# Altium PCB Quickswitch_BRD.PcbDoc (part 1 of 2)
Units mm, origin at the board's own origin, x right, y up, seen from the top; angles counter-clockwise.
Board outline 35 x 35 mm, 2 copper layers (Top Layer, Bottom Layer), stack 1.57 mm thick; 44 components, 30 nets, 158 pads, 68 vias.
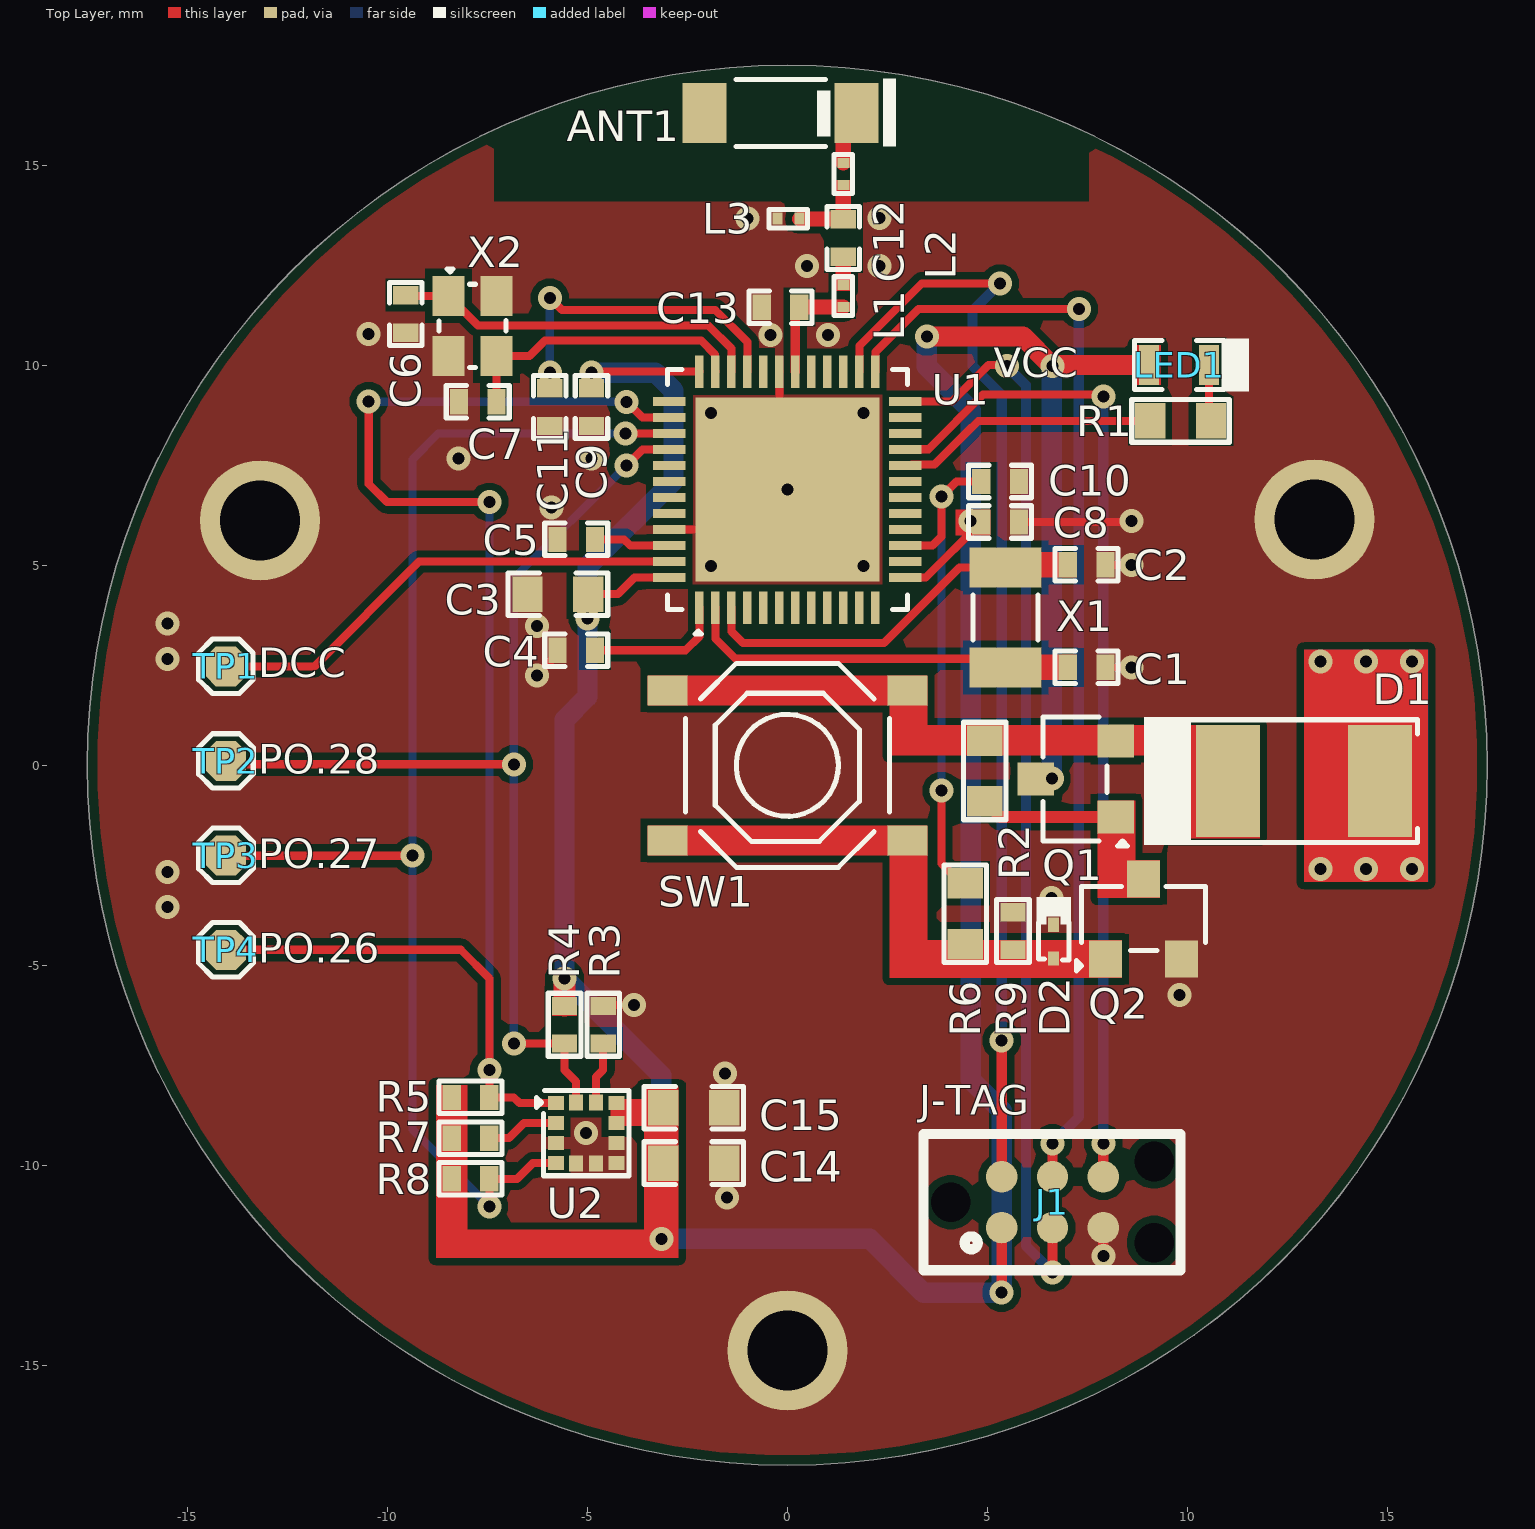
[diagram p0: Top Layer view]
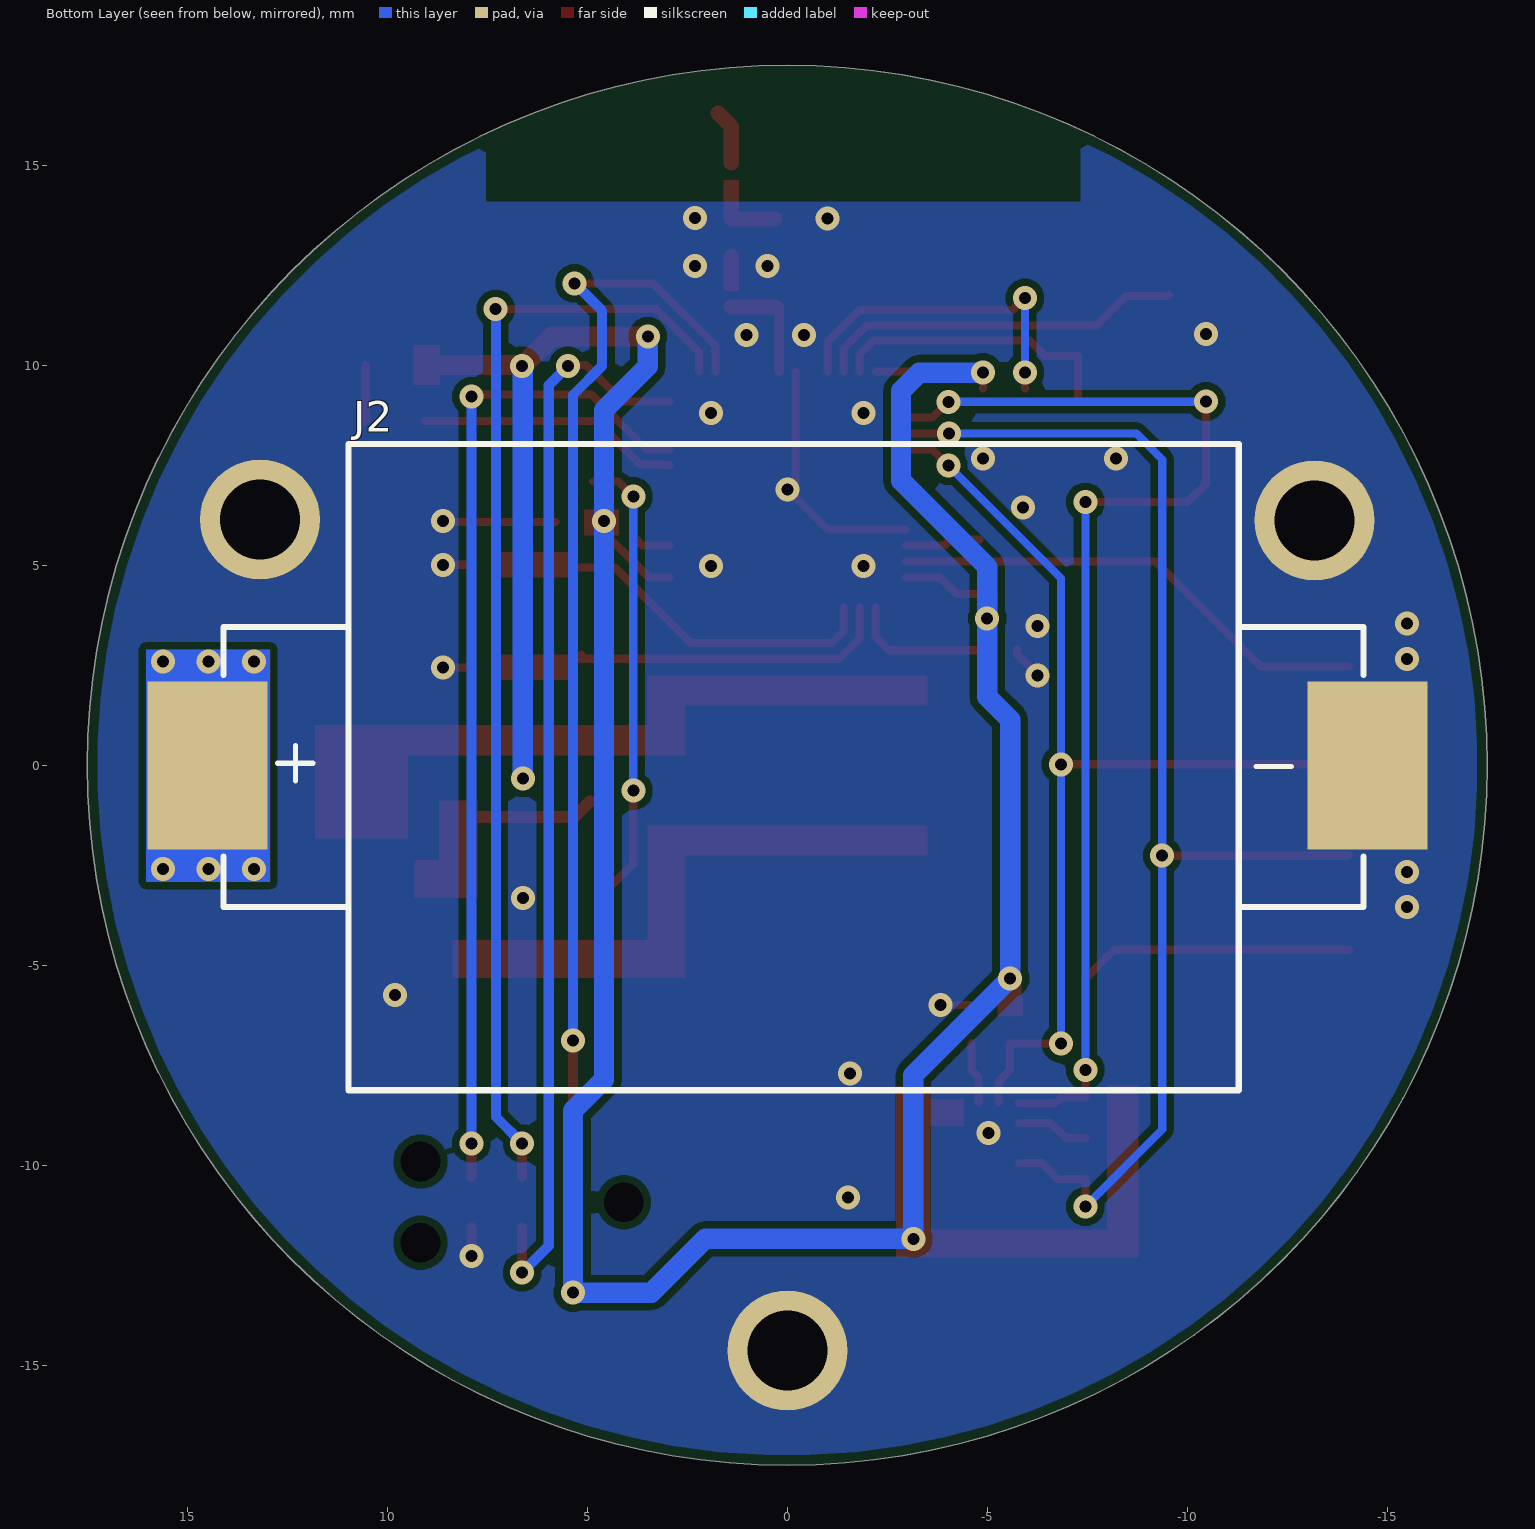
[diagram p1: Bottom Layer view, seen from below]
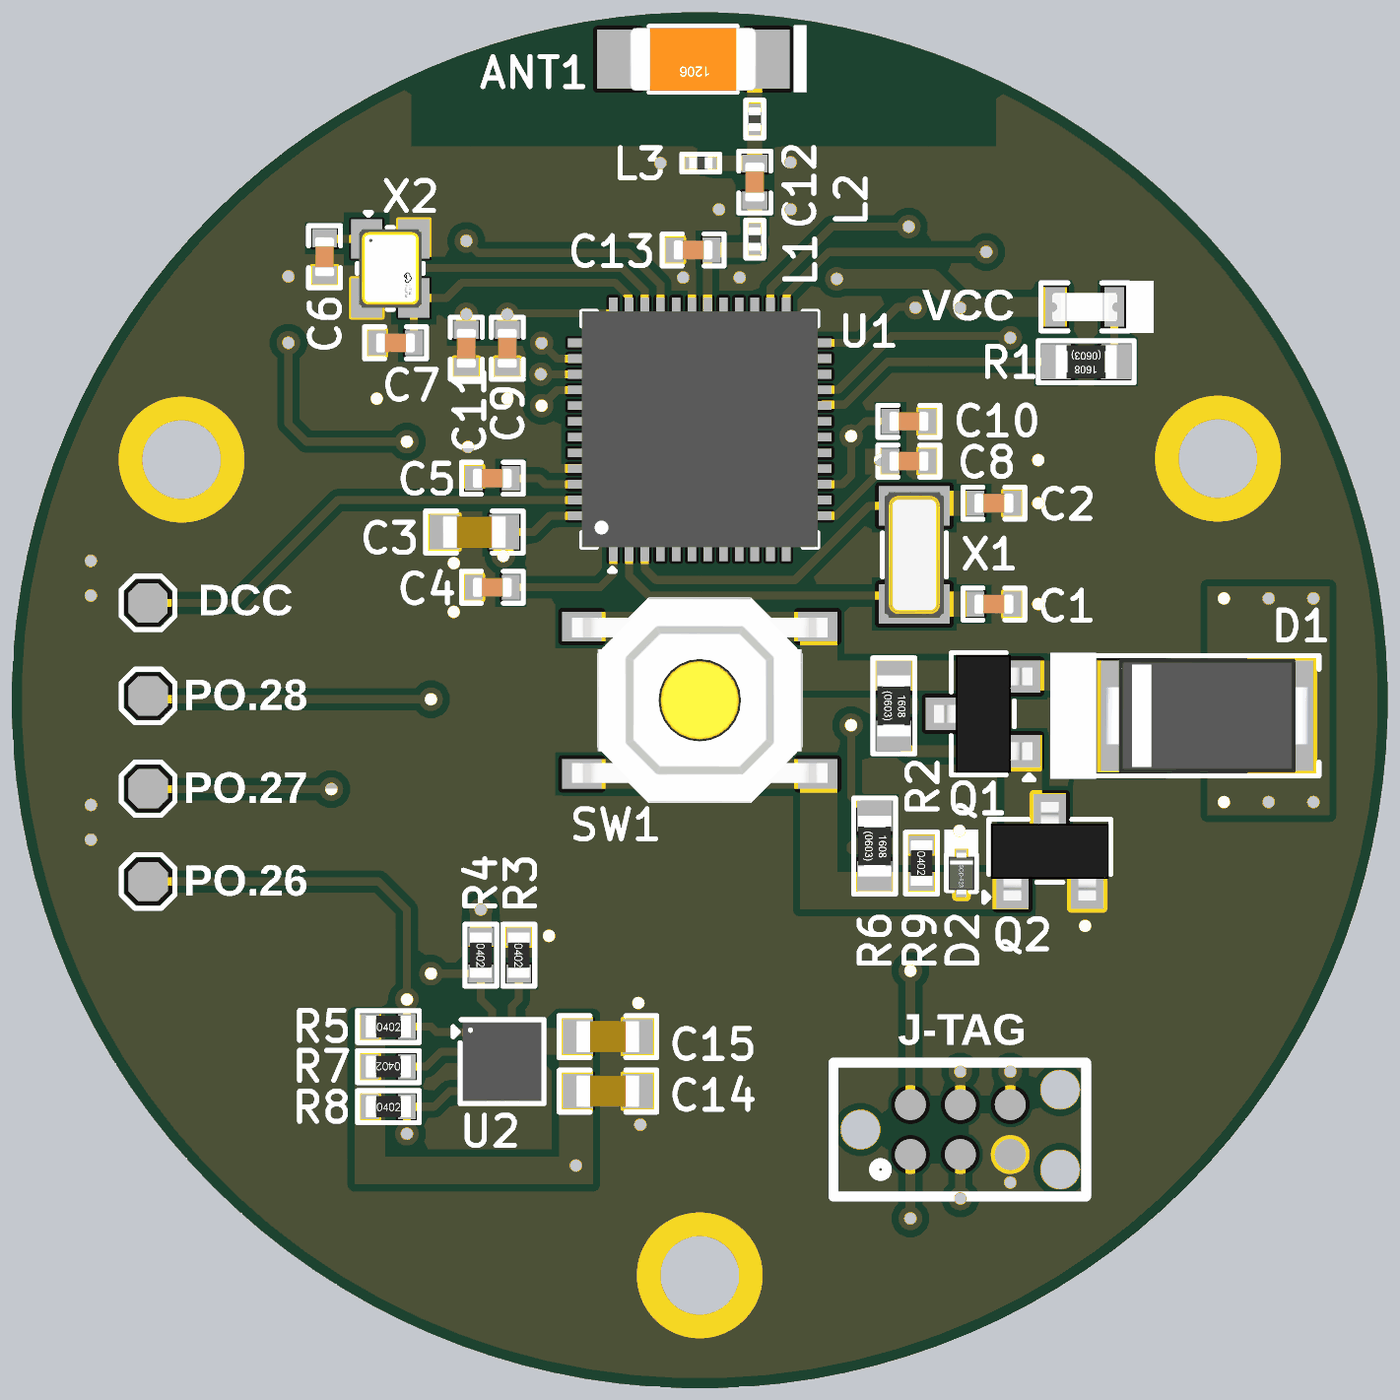
[diagram p2: 3D render of the assembled board from above, using the file's embedded part models]

## Layer stack, top to bottom
Top Solder: solder mask 0.01, Solder Resist, Dk 3.5
Top Layer: signal copper 0.035
Dielectric 1: dielectric 1.5, FR-4, Dk 4.8
Bottom Layer: signal copper 0.035
Bottom Solder: solder mask 0.01, Solder Resist, Dk 3.5

## Board outline
0,-17.5 cw(c0,0) -17.5,0 cw(c0,0) 0,17.5 cw(c0,0) 17.5,0 cw(c0,0)

## Design rules (kind name [scope] priority, off if disabled: settings)
BoardOutlineClearance [All] p1: gap=0 ignorepadtopadclearanceinfootprint=FALSE except(0.254: Poly-OutlineEdge)
Clearance [All] p1: gap=0.178 ignorepadtopadclearanceinfootprint=TRUE except(0.102: Arc-SMDPad Track-SMDPad SMDPad-SMDPad)
HoleSize [All] p1: absolutevalues=TRUE maxlimit=25.4 minlimit=0.025 maxpercent=80.000 minpercent=20.000
MinimumSolderMaskSliver [All] p1: minsoldermaskwidth=0
PolygonConnect [All] p1: connectstyle=Direct reliefconductorwidth=0.254 reliefentries=4 polygonreliefangle="90 Angle" airgapwidth=0.254
RoutingVias [All] p1: holewidth=0.3 width=0.6 viastyle="Through Hole" minholewidth=0.3 minwidth=0.6 maxholewidth=0.3 maxwidth=0.6
SilkToSilkClearance [All] p1: silktosilkclearance=0
SilkToSolderMaskClearance [IsPad] p1: minsilkscreentomaskgap=0 clearancetoexposedcopper=TRUE
SolderMaskExpansion [All] p1: expansion=0.102 istentingtop=FALSE
SupplyNets "Schematic Supply Nets_2" [InNet('VCC')] p1: voltage=0.000
SupplyNets "Schematic Supply Nets_1" [InNet('GND')] p2: voltage=0.000
SupplyNets "Schematic Supply Nets" [InNet('BATT+')] p3: voltage=0.000
UnRoutedNet [All] p1: checkbadconnections=TRUE
Width [All] p1: maxlimit=2.54 minlimit=0.203 preferedwidth=0.559
Width "50 OHM" [InNet('ANT') or InNet('NetC12_2') or InNet('NetC12_1') or InNet('NetANT1_1')] p2: maxlimit=2.636 minlimit=2.636 preferedwidth=2.636 impedanceprofiledriven=TRUE impedanceprofileid={4EB23DA4-F6F3-46A0-BA5C-135B676AABAB} impedanceprofilevalue=50.000000 minimp=50.000000 maximp=50.000000 favimp=50.000000
25 further rules are at their usual default settings.

## Components (designator, comment, footprint, x,y, rotation, side; value= is the part's Value field where it differs from the comment)
ANT1 "2450AT18B100E" ANT-1206 -0.167,16.307 r180 top
C1 "DNP" Cap-0402 7.484,2.448 r180 top locked
C2 "DNP" Cap-0402 7.484,5.013 r180 top locked
C3 "4.7uF" Cap-0603 -5.734,4.28 r0 top locked
C4 "100nF" cap-0402 -5.277,2.875 r0 top locked
C5 "1uF" Cap-0402 -5.276,5.647 r180 top
C6 "10pF" Cap-0402 -9.544,11.283 r90 top
C7 "10pF" Cap-0402 -7.739,9.093 r0 top
C8 "100nF" cap-0402 5.321,6.083 r180 top locked
C9 "100nF" cap-0402 -4.895,8.954 r90 top
C10 "100nF" cap-0402 5.321,7.096 r0 top locked
C11 "100pF" Cap-0402 -5.939,8.954 r270 top
C12 "2.2pF" Cap-0402 1.4,13.183 r90 top
C13 "0.8pF" Cap-0402 -0.168,11.456 r0 top
C14 "0.1uF" Cap-0603 -2.337,-8.559 r180 top locked
C15 "10uF" Cap-0603 -2.337,-9.944 r0 top locked
D1 "SS14" SMA(DO-214AC) 12.911,-0.394 r0 top locked
D2 "ESD9B3.3ST5G-ES" SOD-923. 6.657,-4.409 r270 top locked
J1 "TC2030-IDC-NL" TC2030-IDC-NL_ 6.629,-10.922 r0 top locked
J2 "CR2032-BS-6-1" CR2032-BS-6-1 0,0 r0 bottom locked
L1 "3.9nH" IND-0201 1.4,11.731 r90 top
L2 "3.9nH" IND-0201 1.4,14.783 r90 top
L3 "DNP" IND-0201 0.027,13.665 r0 top
LED1 "XL-1608UBC-04" LED-0603 9.795,10.008 r0 top locked
Q1 "AO3401" SOT-23 7.209,-0.345 r90 top
Q2 "BSS138LT1G" SOT-23 8.906,-3.843 r0 top locked
R1 "330R" Res-0603 9.83,8.611 r0 top locked
R2 "1M" Res-0603 4.938,-0.142 r90 top
R3 "10K" Res-0402 -4.604,-6.485 r270 top locked value=10kR
R4 "10K" Res-0402 -5.569,-6.485 r270 top locked value=10kR
R5 "4.7K" Res-0402 -7.92,-8.303 r0 top locked
R6 "470R" Res-0603 4.449,-3.71 r90 top locked
R7 "10K" Res-0402 -7.92,-9.321 r180 top locked value=10kR
R8 "4.7K" Res-0402 -7.92,-10.339 r0 top locked
R9 "10K" Res-0402 5.641,-4.142 r270 top locked value=10kR
SW1 "TS-1187A-B-A-B" TS-1187A-B-A-B 0,0 r0 top locked
TP1 "TEST POINT 0.5mm Dia" "Test-point - 0.5mm" -14.037,2.475 r90 top locked
TP2 "TEST POINT 0.5mm Dia" "Test-point - 0.5mm" -14.034,0.111 r0 top locked
TP3 "TEST POINT 0.5mm Dia" "Test-point - 0.5mm" -14.034,-2.251 r0 top locked
TP4 "TEST POINT 0.5mm Dia" "Test-point - 0.5mm" -14.034,-4.612 r0 top locked
U1 "NRF52832-QFAA-R" QFN-48-EP(6x6) 0,6.893 r90 top
U2 "LIS2DW12TR" "12-LGA (2x2)" -5.029,-9.194 r0 top locked
X1 "DNP" SMD3215-2P 5.459,3.698 r90 top locked
X2 "32MHz" SMD2016-4P -7.871,10.986 r270 top

## Footprints (in the part's own frame and the unit in brackets; to place one, negate y for a bottom-side part, rotate by r counter-clockwise, add the part's x,y. Pads: shape width x height; smd on the part's side, far side on the other; paste and mask are expansions set on the pad)
"12-LGA (2x2)" [mm]
  rect 0.4x0.35 smd mask+0.05: 1(-0.76,0.75) 2(-0.76,0.25) 3(-0.76,-0.25) 4(-0.76,-0.75) 7(0.76,-0.75) 8(0.76,-0.25) 9(0.76,0.25) 10(0.76,0.75)
  rect 0.35x0.4 smd mask+0.05: 5(-0.25,-0.76) 6(0.25,-0.76) 11(0.25,0.76) 12(-0.25,0.76)
  silkscreen extent -1.24,-1.07 1.07,1.07, body extent -1,-1 1,1, height 0.7
ANT-1206 [mm]
  rect 1.1x1.5 smd: 1(-1.9,0) 2(1.9,0)
  silkscreen extent -2.89,-0.86 1.12,0.84, body extent -1.6,-0.8 1.6,0.8, height 1
Cap-0402 [mil]
  rect 18x25 smd mask+2.36: 1(-18.5,0) 2(18.5,0)
  silkscreen extent -31,-16 31,16, body extent -20,-10 20,10, height 19
cap-0402 [mil]
  rect 18x25 smd mask+2.36: 1(-18.5,0) 2(18.5,0)
  silkscreen extent -31,-16 31,16, body extent -20,-10 20,10, height 19
Cap-0603 [mil]
  rect 30x35 smd mask+2.36: 1(-30,0) 2(30,0)
  silkscreen extent -49,-21 49,21, body extent -32,-16 31,16, height 34
CR2032-BS-6-1 [mm]
  rect 3x4.2 smd: 1(14.5,0) 2(-14.5,0)
  silkscreen extent -14.41,-8.03 14.09,8.12, body extent -15.65,-8 15.65,8, height 5.6
IND-0201 [mm]
  rect 0.25x0.3 smd mask+0.055: 1(-0.275,0) 2(0.275,0)
  silkscreen extent -0.48,-0.23 0.48,0.23, body extent -0.3,-0.15 0.3,0.15, height 0.15
LED-0603 [mm]
  rect 0.5x1 smd: 1(-0.75,0) 2(0.75,0)
  silkscreen extent -1.12,-0.66 1.75,0.66, body extent -0.82,-0.37 0.82,0.36, height 0.68
QFN-48-EP(6x6) [mm]
  rect 0.81x0.22 smd mask+0.07: 1(-2.95,2.2) 2(-2.95,1.8) 3(-2.95,1.4) 4(-2.95,1) 5(-2.95,0.6) 6(-2.95,0.2) 7(-2.95,-0.2) 8(-2.95,-0.6) 9(-2.95,-1) 10(-2.95,-1.4) 11(-2.95,-1.8) 12(-2.95,-2.2) 25(2.95,-2.2) 26(2.95,-1.8) 27(2.95,-1.4) 28(2.95,-1) 29(2.95,-0.6) 30(2.95,-0.2) 31(2.95,0.2) 32(2.95,0.6) 33(2.95,1) 34(2.95,1.4) 35(2.95,1.8) 36(2.95,2.2)
  rect 0.22x0.81 smd mask+0.07: 13(-2.2,-2.95) 14(-1.8,-2.95) 15(-1.4,-2.95) 16(-1,-2.95) 17(-0.6,-2.95) 18(-0.2,-2.95) 19(0.2,-2.95) 20(0.6,-2.95) 21(1,-2.95) 22(1.4,-2.95) 23(1.8,-2.95) 24(2.2,-2.95) 37(2.2,2.95) 38(1.8,2.95) 39(1.4,2.95) 40(1,2.95) 41(0.6,2.95) 42(0.2,2.95) 43(-0.2,2.95) 44(-0.6,2.95) 45(-1,2.95) 46(-1.4,2.95) 47(-1.8,2.95) 48(-2.2,2.95)
  rect 4.6x4.6 smd paste-3: 49(0,0)
  silkscreen extent -3.61,-3 3,3, body extent -3,-3 3,3, height 0.9
Res-0402 [mil]
  rect 18x25 smd mask+2.17: 1(-18.5,0) 2(18.5,0)
  silkscreen extent -32,-17 32,16, body extent -23,-11 23,11, height 16
Res-0603 [mil]
  rect 30x35 smd: 1(-30,0) 2(30,0)
  silkscreen extent -48,-21 48,21, body extent -31,-17 31,17, height 18
SMA(DO-214AC) [mm]
  rect 1.6x2.8 smd: 1(-1.9,0) 2(1.9,0)
  silkscreen extent -3.99,-1.6 2.84,1.6, body extent -2.6,-1.45 2.6,1.45, height 2.3
SMD2016-4P [mm]
  rect 1x0.8 smd paste+0 mask+0.051: 1(-0.75,-0.6) 2(0.75,-0.6) 3(0.75,0.6) 4(-0.75,0.6)
  silkscreen extent -1.42,-0.84 1.04,0.84, body extent -1,-0.8 1,0.8, height 0.47
SMD3215-2P [mm]
  rect 1x1.8 smd: 1(-1.25,0) 2(1.25,0)
  silkscreen extent -0.56,-0.81 0.56,0.81, body extent -1.6,-0.75 1.6,0.75, height 0.8
SOD-923. [mm]
  rect 0.36x0.27 smd: 1(-0.42,0) 2(0.42,0)
  silkscreen extent -1.12,-0.43 0.46,0.43, body extent -0.52,-0.32 0.53,0.33, height 0.43
SOT-23 [mm] "TRANS NPN 40V 0.6A SOT23"
  rect 0.82x0.92 smd: 1(-0.95,-1) 2(0.95,-1) 3(0,1)
  silkscreen extent -1.68,-1.3 1.55,0.81, body extent -1.5,-1.25 1.5,1.25, height 1.05
TC2030-IDC-NL_ [mil]
  round 30.98 smd: 1(-50,-25) 1(-50,-25) 2(-50,25) 3(0,-25) 4(0,25) 5(50,-25) 6(50,25)
  round 0 hole 39.02: MP1(-100,0) MP2(100,40) MP3(100,-40)
  silkscreen extent -127,-67 126,67
"Test-point - 0.5mm" [mm]
  oct 1x1 smd: 1(0,0)
  silkscreen extent -0.68,-0.68 0.68,0.68
TS-1187A-B-A-B [mm]
  rect 1x0.75 smd: 1(-3,1.875) 2(3,1.875) 3(-3,-1.875) 4(3,-1.875)
  silkscreen extent -2.55,-2.55 2.55,2.55, body extent -3.25,-2.6 3.25,2.6, height 1.55

## Part data
ANT1: "RF ANT 2.4GHZ CHIP SOLDER SMD", Manufacturer=Johanson, Category="RF Antennas", ComponentLink1Description=https://datasheet.ciiva.com/24025/antenna-2450at18b100-242422-24025839.pdf?src-supplier=Mouser, ComponentLink1URL=https://datasheet.ciiva.com/24025/antenna-2450at18b100-242422-24025839.pdf?src-supplier=Mouser, ComponentLink2Description=https://datasheet.ciiva.com/1124/1318299-1124918.pdf?src-supplier=Element14, ComponentLink2URL=https://datasheet.ciiva.com/1124/1318299-1124918.pdf?src-supplier=Element14, Manufacturer Part Number=2450AT18B100E, Pricing="3000=0.3724, 6000=0.3688, 9000=0.3651, 12000=0.3615, 15000=0.3579, 30000=0.3542 (USD)", RoHS=Yes, Stock=792000, Supplier="Arrow Electronics", Supplier Part Number=2450AT18B100E
C1 C2: library part CC0402FRNPO9BN130, "CAP CER 13PF 50V C0G/NP0 0402", LCSC Part Number=C541433, Manufacturer=Yageo, Item Type=Capacitors, Manufacturer Part Number=CC0402FRNPO9BN130, Pricing="10000=0.00937 (USD)", RoHS=No, Supplier=Digikey
C3: library part GRM188R61E475KE11D, "CAP CER 4.7UF 25V X5R 0603", Case Code (Imperial)=0603, Case Code (Metric)=1608, Dielectric=X5R, LCSC Part Number=C90057, Manufacturer=Murata, Max Operating Temperature=85°C, Min Operating Temperature=-55°C, Package Quantity=4000, Supplier Part Number 1=490-7203-1-ND, Tolerance=10%, Voltage=25V, Capacitance=4.7uF, Case/Package=0603, ComponentLink1Description=http://www.farnell.com/datasheets/2048165.pdf?src-supplier=Element14, ComponentLink1URL=http://www.farnell.com/datasheets/2048165.pdf?src-supplier=Element14, ComponentLink2Description=https://www.murata.com/~/media/webrenewal/support/library/catalog/products/capacitor/mlcc/c02e.ashx?la=en-us&src-supplier=Digi-Key, ComponentLink2URL=https://www.murata.com/~/media/webrenewal/support/library/catalog/products/capacitor/mlcc/c02e.ashx?la=en-us&src-supplier=Digi-Key, Depth=0.8mm, Height=0.8mm, Lead Free="Lead Free", Length=1.6mm, Manufacturer Part Number=GRM188R61E475KE11D, Material=Ceramic, Mount="Surface Mount", Packaging="Cut Tape", Pricing 1="1=0.37, 10=0.258, 100=0.1549, 500=0.1162, 1000=0.09812 (USD)", REACH SVHC="No SVHC", Stock 1=71618, Supplier 1=Digi-Key, Thickness=0.031inch, Voltage Rating=25V, Voltage Rating (DC)=25V, Width=0.031inch
C4 C8 C9 C10: library part C1005X7R1H104KT000F, "CAP CER 0.1UF 50V X7R 0402", Dielectric=X7R, LCSC Part Number=C361198, Manufacturer=TDK, Tolerance=10%, Voltage=25V, Category="Ceramic Capacitors", ComponentLink1Description=LCSC, ComponentLink1URL=https://www.lcsc.com/product-detail/Multilayer-Ceramic-Capacitors-MLCC-SMD-SMT_TDK-C1005X7R1H104KT000F_C361198.html, Item Type=Capacitor, Manufacturer Part Number=C1005X7R1H104KT000F, RoHS=No, Supplier 1=Avnet, Supplier Part Number 1=C1005X7R1H104KT000F
C5: library part CC0402KRX5R7BB105, "CAP CER 1UF 16V X5R 0402", Case Code (Imperial)=0402, Case Code (Metric)=1005, Dielectric=X5R, LCSC Part Number=C325464, Manufacturer=Yageo, Max Operating Temperature=85°C, Min Operating Temperature=-55°C, Supplier Part Number 1=311-1691-6-ND, Tolerance=10%, Voltage Rating=16V, Capacitance=1uF, Case/Package=0402, ComponentLink1Description=http://www.yageo.com/documents/recent/UPY-GPHC_X5R_4V-to-50V_12.pdf?src-supplier=Avnet+Europe, ComponentLink1URL=http://www.yageo.com/documents/recent/UPY-GPHC_X5R_4V-to-50V_12.pdf?src-supplier=Avnet+Europe, Composition=Ceramic, Depth=0.5mm, Halogen Free="Halogen Free", Height=0.5mm, Item Type=Capacitor, Lead Free="Lead Free", Length=1mm, Manufacturer Part Number=CC0402KRX5R7BB105, Mount="Surface Mount", Packaging="Tape and Reel", Pricing 1="1=0.36, 10=0.252, 100=0.1512, 500=0.1134, 1000=0.09576, 2500=0.09072, 5000=0.08568 (USD)", Radiation Hardening=No, Stock 1=1405667, Supplier 1=Digi-Key, Termination=SMD/SMT, Thickness=0.022inch, Voltage Rating (DC)=16V, Weight=2.3E-05oz, Width=0.02inch
C6 C7: library part GRM1555C1H100JA01D, "CAP CER 10PF 50V C0G/NP0 0402", Case Code (Imperial)=0402, Case Code (Metric)=1005, Dielectric=C0G, LCSC Part Number=C76946, Manufacturer=Murata, Max Operating Temperature=125°C, Min Operating Temperature=-55°C, Package Quantity=1, Tolerance=5%, Voltage=50V, Case/Package=0402, Category="Ceramic Capacitors", ComponentLink1Description=https://datasheet.ciiva.com/2989/product-2989280.pdf?src-supplier=Avnet, ComponentLink1URL=https://datasheet.ciiva.com/2989/product-2989280.pdf?src-supplier=Avnet, ComponentLink2Description=https://datasheet.ciiva.com/18184/getdatasheetpartid-307234-18184164.pdf?src-supplier=Verical, ComponentLink2URL=https://datasheet.ciiva.com/18184/getdatasheetpartid-307234-18184164.pdf?src-supplier=Verical, ComponentLink3Description=https://datasheet.ciiva.com/29200/453545-da-01-en-vs-kondensator-0402-29200107.pdf?src-supplier=Conrad, ComponentLink3URL=https://datasheet.ciiva.com/29200/453545-da-01-en-vs-kondensator-0402-29200107.pdf?src-supplier=Conrad, ComponentLink4Description=https://datasheet.ciiva.com/7828/1666664-7828812.pdf?src-supplier=Element14, ComponentLink4URL=https://datasheet.ciiva.com/7828/1666664-7828812.pdf?src-supplier=Element14, ComponentLink5Description=https://datasheet.ciiva.com/6271/partnumbering-e-01-6271159.pdf?src-supplier=Digi-Key, ComponentLink5URL=https://datasheet.ciiva.com/6271/partnumbering-e-01-6271159.pdf?src-supplier=Digi-Key, ComponentLink6Description=https://datasheet.ciiva.com/6271/partnumbering-e-01-6271158.pdf?src-supplier=Digi-Key, ComponentLink6URL=https://datasheet.ciiva.com/6271/partnumbering-e-01-6271158.pdf?src-supplier=Digi-Key, ComponentLink7Description=https://datasheet.ciiva.com/6271/partnumbering-e-01-6271068.pdf?src-supplier=Digi-Key, ComponentLink7URL=https://datasheet.ciiva.com/6271/partnumbering-e-01-6271068.pdf?src-supplier=Digi-Key, Construction=Flat, Depth=0.5mm, Height=0.5mm, Item Type=Capacitor, Lead Free="Lead Free", Length=1mm, Manufacturer Part Number=GRM1555C1H100JA01D, Material=Ceramic, Mounting Technology="Surface Mount", Packaging="Tape and Reel", Pricing="10000=0.0034, 50000=0.0027, 100000=0.0023, 250000=0.0021 (USD)", Radiation Hardening=No, Reach SVHC Compliant=No, RoHS=Yes, RoHS Compliant=Yes, Series=GRM, Stock=3860000, Supplier="Arrow Electronics", Supplier Part Number=GRM1555C1H100JA01D, Termination=SMD/SMT, Thickness=0.022inch, Voltage Rating=50V, Voltage Rating (DC)=50V, Width=0.02inch
C11: library part 04025A101JAT2A, "CAP CER 100PF 50V C0G/NP0 0402", Case Code (Imperial)=0402, Case Code (Metric)=1005, Dielectric=C0G, Insulation Resistance=1GR, LCSC Part Number=C597014, Manufacturer="Kyocera AVX", Max Operating Temperature=125°C, Min Operating Temperature=-55°C, Package Quantity=10000, Temperature Coefficient=30ppm/°C, Tolerance=5%, Voltage=50V, Capacitance=100pF, Case/Package=0402, Category="Ceramic Capacitors", ComponentLink1Description=https://datasheet.ciiva.com/11786/0900766b80def0e2-11786618.pdf?src-supplier=RSComponents, ComponentLink1URL=https://datasheet.ciiva.com/11786/0900766b80def0e2-11786618.pdf?src-supplier=RSComponents, ComponentLink2Description=https://datasheet.ciiva.com/1123/493359-1123473.pdf?src-supplier=Element14, ComponentLink2URL=https://datasheet.ciiva.com/1123/493359-1123473.pdf?src-supplier=Element14, ComponentLink3Description=https://datasheet.ciiva.com/1123/493359-1123474.pdf?src-supplier=Element14, ComponentLink3URL=https://datasheet.ciiva.com/1123/493359-1123474.pdf?src-supplier=Element14, ComponentLink4Description=https://datasheet.ciiva.com/16332/ccog-16332501.pdf?src-supplier=Future+Electronics, ComponentLink4URL=https://datasheet.ciiva.com/16332/ccog-16332501.pdf?src-supplier=Future+Electronics, ComponentLink5Description=https://datasheet.ciiva.com/46392/759117-46392007.pdf?src-supplier=Element14, ComponentLink5URL=https://datasheet.ciiva.com/46392/759117-46392007.pdf?src-supplier=Element14, ComponentLink6Description=https://datasheet.ciiva.com/150/ccog-150473.pdf?src-supplier=Digi-Key, ComponentLink6URL=https://datasheet.ciiva.com/150/ccog-150473.pdf?src-supplier=Digi-Key, ComponentLink7Description=https://datasheet.ciiva.com/150/ccog-150474.pdf?src-supplier=Digi-Key, ComponentLink7URL=https://datasheet.ciiva.com/150/ccog-150474.pdf?src-supplier=Digi-Key, ComponentLink8Description=https://datasheet.ciiva.com/2987/ccog-2987642.pdf?src-supplier=Avnet, ComponentLink8URL=https://datasheet.ciiva.com/2987/ccog-2987642.pdf?src-supplier=Avnet, ComponentLink9Description=https://datasheet.ciiva.com/150/ccog-150475.pdf?src-supplier=Digi-Key, ComponentLink9URL=https://datasheet.ciiva.com/150/ccog-150475.pdf?src-supplier=Digi-Key, ComponentLink10Description=https://datasheet.ciiva.com/8083/ccog-8083054.pdf?src-supplier=Avnet, ComponentLink10URL=https://datasheet.ciiva.com/8083/ccog-8083054.pdf?src-supplier=Avnet, ComponentLink11Description=https://datasheet.ciiva.com/5413/ccog-5413647.pdf?src-supplier=Mouser, ComponentLink11URL=https://datasheet.ciiva.com/5413/ccog-5413647.pdf?src-supplier=Mouser, Construction=Flat, Contact Plating=Tin,Matte, Depth=0.5mm, Dissipation Factor=2.5%, Height=0.56mm, Item Type=Capacitor, Lead Free="Lead Free", Length=1mm, Manufacturer Part Number=04025A101JAT2A, Mount="Surface Mount,PCB", Packaging="Tape and Reel", Pricing 1="10000=0.10788, 20000=0.10540, 40000=0.10292, 60000=0.10044, 80000=0.09796, 100000=0.09548, 1000000=0.09424 (USD)", Radiation Hardening=No, Reach SVHC Compliant=Yes, RoHS=Yes, RoHS Compliant=Yes, Series=-, Stock 1=3437500, Supplier 1=Avnet, Supplier Part Number 1=04025A101JAT2A, Termination=SMD/SMT, Thickness=0.013inch, Voltage Rating=50V, Voltage Rating (DC)=50V, Width=0.004inch
C12: library part GRM1555C1H2R2BA01D, "CAP CER 2.2PF 50V C0G/NP0 0402", Case Code (Imperial)=0402, Case Code (Metric)=1005, Dielectric=C0G, LCSC Part Number=C88927, Manufacturer=Murata, Max Operating Temperature=125°C, Min Operating Temperature=-55°C, Package Quantity=1, Temperature Coefficient=30ppm/°C, Voltage=50V, Case/Package=0402, Category="Ceramic Capacitors", ComponentLink1Description=https://datasheet.ciiva.com/6270/grm1555c1h2r1wa01-01-6270869.pdf?src-supplier=Digi-Key, ComponentLink1URL=https://datasheet.ciiva.com/6270/grm1555c1h2r1wa01-01-6270869.pdf?src-supplier=Digi-Key, ComponentLink2Description=https://datasheet.ciiva.com/18184/getdatasheetpartid-316203-18184296.pdf?src-supplier=Verical, ComponentLink2URL=https://datasheet.ciiva.com/18184/getdatasheetpartid-316203-18184296.pdf?src-supplier=Verical, ComponentLink3Description=https://datasheet.ciiva.com/16440/c02e-16440539.pdf?src-supplier=Future+Electronics, ComponentLink3URL=https://datasheet.ciiva.com/16440/c02e-16440539.pdf?src-supplier=Future+Electronics, ComponentLink4Description=https://datasheet.ciiva.com/6270/partnumbering-e-01-6270873.pdf?src-supplier=Digi-Key, ComponentLink4URL=https://datasheet.ciiva.com/6270/partnumbering-e-01-6270873.pdf?src-supplier=Digi-Key, ComponentLink5Description=https://datasheet.ciiva.com/6270/partnumbering-e-01-6270877.pdf?src-supplier=Digi-Key, ComponentLink5URL=https://datasheet.ciiva.com/6270/partnumbering-e-01-6270877.pdf?src-supplier=Digi-Key, ComponentLink6Description=https://datasheet.ciiva.com/11615/product-11615030.pdf?src-supplier=Avnet, ComponentLink6URL=https://datasheet.ciiva.com/11615/product-11615030.pdf?src-supplier=Avnet, Construction=Flat, Depth=0.5mm, Height=0.5mm, Item Type=Capacitor, Lead Free="Lead Free", Length=1mm, Manufacturer Part Number=GRM1555C1H2R2BA01D, Material=Ceramic, Mounting Technology="Surface Mount", Packaging="Tape and Reel", Pricing="10000=0.00887, 20000=0.00867, 40000=0.00847 (USD)", Radiation Hardening=No, Reach SVHC Compliant=No, RoHS=Yes, RoHS Compliant=Yes, Series=GRM, Stock=110000, Supplier=Avnet, Supplier Part Number=GRM1555C1H2R2BA01D, Termination=SMD/SMT, Thickness=0.022inch, Voltage Rating=50V, Voltage Rating (DC)=50V, Width=0.5mm
C13: library part CC0402BRNPO9BNR80, "CAP CER 0.8PF 50V C0G/NPO 0402", Case Code (Imperial)=0402, Case Code (Metric)=1005, Dielectric=C0G, LCSC Part Number=C327032, Manufacturer=Yageo, Max Operating Temperature=125°C, Min Operating Temperature=-55°C, Supplier Part Number=4783825, Voltage Rating=50V, Case/Package=0402, Category="Ceramic Capacitors", ComponentLink1Description=http://www.mouser.com/ds/2/447/Yageo_UPY-GP_NP0_16V-to-50V_9-358835.pdf?src-supplier=Mouser, ComponentLink1URL=http://www.mouser.com/ds/2/447/Yageo_UPY-GP_NP0_16V-to-50V_9-358835.pdf?src-supplier=Mouser, ComponentLink2Description=https://datasheet.octopart.com/CC0402BRNPO9BNR80-Yageo-datasheet-151948684.pdf?src-supplier=Newark, ComponentLink2URL=https://datasheet.octopart.com/CC0402BRNPO9BNR80-Yageo-datasheet-151948684.pdf?src-supplier=Newark, ComponentLink3Description=http://www.yageo.com/documents/recent/UPY-GP_NP0_16V-to-50V_16.pdf?src-supplier=Digikey, ComponentLink3URL=http://www.yageo.com/documents/recent/UPY-GP_NP0_16V-to-50V_16.pdf?src-supplier=Digikey, ComponentLink4Description=https://www.yageo.com/upload/media/product/productsearch/datasheet/mlcc/UPY-GP_NP0_16V-to-50V_18.pdf?src-supplier=Digikey, ComponentLink4URL=https://www.yageo.com/upload/media/product/productsearch/datasheet/mlcc/UPY-GP_NP0_16V-to-50V_18.pdf?src-supplier=Digikey, ComponentLink5Description=https://datasheet.octopart.com/CC0402BRNPO9BNR80-Yageo-datasheet-151948684.pdf?src-supplier=Farnell, ComponentLink5URL=https://datasheet.octopart.com/CC0402BRNPO9BNR80-Yageo-datasheet-151948684.pdf?src-supplier=Farnell, ComponentLink6Description=https://datasheet.octopart.com/CC0402BRNPO9BNR80-Yageo-datasheet-137875056.pdf?src-supplier=Future+Electronics, ComponentLink6URL=https://datasheet.octopart.com/CC0402BRNPO9BNR80-Yageo-datasheet-137875056.pdf?src-supplier=Future+Electronics, Halogen Free=5694HalogenFree, Item Type=Capacitor, Lead Free=5697LeadFree, Length=0.039inch, Manufacturer Part Number=CC0402BRNPO9BNR80, Mounting Technology="Surface Mount", Packaging="Tape and Reel", Pricing="10000=0.0034, 40000=0.0032, 150000=0.0031, 250000=0.003, 500000=0.0028 (USD)", RoHS=Yes, RoHS Compliant=Yes, Series=CC, Stock=70000, Supplier="Future Electronics", Termination=SMD/SMT, Thickness=0.022inch, Voltage Rating (DC)=50V, Weight=2.3E-05oz, Width=0.02inch
C14: library part CC0603ZRY5V9BB104, "CAP CER 0.1UF 50V Y5V 0603", Capacitance=100nF, Case Code (Imperial)=0603, Case Code (Metric)=1608, Dielectric=Y5V, LCSC Part Number=C106221, Manufacturer=Yageo, Max Operating Temperature=85°C, Min Operating Temperature=-30°C, Package Quantity=1, Supplier Part Number 1=311-1343-1-ND, Tolerance=80%, Voltage=50V, Case/Package=0603, ComponentLink1Description=http://www.yageo.com/documents/recent/UPY-GPHC_Y5V_6.3V-to-50V_8.pdf?src-supplier=Digi-Key, ComponentLink1URL=http://www.yageo.com/documents/recent/UPY-GPHC_Y5V_6.3V-to-50V_8.pdf?src-supplier=Digi-Key, ComponentLink2Description=http://www.yageo.com/documents/recent/UPY-GPHC_Y5V_6.3V-to-50V_5.pdf?src-supplier=Avnet+Europe, ComponentLink2URL=http://www.yageo.com/documents/recent/UPY-GPHC_Y5V_6.3V-to-50V_5.pdf?src-supplier=Avnet+Europe, ComponentLink3Description=https://www.verical.com/server-webapp/html/getDatasheet?partID=403611&src-supplier=Verical, ComponentLink3URL=https://www.verical.com/server-webapp/html/getDatasheet?partID=403611&src-supplier=Verical, ComponentLink4Description=http://www.mouser.com/ds/2/447/Yageo_UPY-GP_NP0_16V-to-50V_9-358835.pdf?src-supplier=Mouser, ComponentLink4URL=http://www.mouser.com/ds/2/447/Yageo_UPY-GP_NP0_16V-to-50V_9-358835.pdf?src-supplier=Mouser, ComponentLink5Description=http://www.farnell.com/datasheets/1132289.pdf?src-supplier=Element14, ComponentLink5URL=http://www.farnell.com/datasheets/1132289.pdf?src-supplier=Element14, Composition=Ceramic, Depth=0.8mm, Halogen Free="Halogen Free", Height=0.8mm, Item Type=Capacitor, Lead Free="Lead Free", Length=1.6mm, Manufacturer Part Number=CC0603ZRY5V9BB104, Mount="Surface Mount", Number of Pins=2, Packaging="Tape and Reel", Pricing 1="1=0.1, 10=0.075, 100=0.0334, 500=0.02386, 1000=0.01874 (USD)", Radiation Hardening=No, REACH SVHC="No SVHC", Stock 1=15000880, Supplier 1=Digi-Key, Termination=SMD/SMT, Thickness=0.035inch, Voltage Rating=50V, Voltage Rating (DC)=50V, Width=0.031inch
C15: library part CGA0603X5R106K100JT, "10V 10uF X5R ±10% 0603 Multilayer Ceramic Capacitors MLCC - SMD/SMT ROHS", LCSC Part Number=C6119842, Manufacturer=HRE, Package=0603, ComponentLink1Description=LCSC, ComponentLink1URL=https://www.lcsc.com/product-detail/Multilayer-Ceramic-Capacitors-MLCC-SMD-SMT_HRE-CGA0603X5R106K100JT_C6119842.html, Item Type=Capacitor, Manufacturer Part Number=CGA0603X5R106K100JT
D1: "40V Independent Type 1A 550mV@1A SMA(DO-214AC) Schottky Diodes ROHS", LCSC Part Number=C2480, Manufacturer="MDD(Microdiode Semiconductor)", Package=SMA(DO-214AC), ComponentLink1Description=LCSC, ComponentLink1URL=https://www.lcsc.com/product-detail/Schottky-Diodes_MDD-Microdiode-Semiconductor-SS14_C2480.html?s_z=n_C2480, Item Type=Diode, Manufacturer Part Number=SS14
D2: "6A 80W 10V 3.7V Bidirectional 3.3V SOD-923 ESD and Surge Protection (TVS/ESD) ROHS", LCSC Part Number=C5180230, Manufacturer=ElecSuper, Package=SOD-923, ComponentLink1Description=LCSC, ComponentLink1URL=https://www.lcsc.com/product-detail/ESD-and-Surge-Protection-TVS-ESD_ElecSuper-ESD9B3-3ST5G-ES_C5180230.html?s_z=n_C5180230, Item Type=Diode, Manufacturer Part Number=ESD9B3.3ST5G-ES
J2: "Battery base CR2032 SMD Battery Connectors ROHS", LCSC Part Number=C70377, Manufacturer=Q&J, ComponentLink1Description=LCSC, ComponentLink1URL=https://www.lcsc.com/product-detail/Battery-Connectors_Q-J-CR2032-BS-6-1_C70377.html, Item Type=Connector, Manufacturer Part Number=CR2032-BS-6-1
L1 L2: library part LQP03TG3N9B02D, "FIXED IND 3.9NH 350MA 350MOHM SM", Case/Package=0201, Current Rating=350mA, DC Resistance (DCR)=350mR, LCSC Part Number=C86114, Manufacturer=Murata, Max Operating Temperature=125°C, Min Operating Temperature=-55°C, Package Quantity=15000, Self Resonant Frequency=6GHz, Test Frequency=500MHz, ComponentLink1Description=https://datasheet.ciiva.com/29691/jelf243c-0016-29691349.pdf?src-supplier=Digikey, ComponentLink1URL=https://datasheet.ciiva.com/29691/jelf243c-0016-29691349.pdf?src-supplier=Digikey, DC Current=350mA, Depth=0.33mm, Height=0.3mm, Height - Seated (Max)=0.013inch, Item Type=Inductors, Length=0.024inch, Manufacturer Part Number=LQP03TG3N9B02D, Max DC Current=350mA, Military Standard=Not, Mounting Technology="Surface Mount", Packaging="Tape and Reel", Pricing="1=0.1, 10=0.025, 25=0.0224, 50=0.0208, 100=0.0193, 250=0.01748, 500=0.0162, 1000=0.01502, 2500=0.01358 (USD)", RoHS=Yes, RoHS Compliant=Yes, Series=LQP03TG_02, Shielding=Unshielded, Stock=170, Supplier=Digikey, Technology="THIN FILM", Width=0.012inch
L3: library part LQP03TN2N7B02D, "FIXED IND 2.7NH 500MA 200MOHM SM", Case Code (Imperial)=0201, Case Code (Metric)=0603, Current=350mA, Current Rating=500mA, DC Resistance (DCR)=200mR, Inductance=2.7nH, LCSC Part Number=C98043, Manufacturer=Murata, Max Operating Temperature=125°C, Min Operating Temperature=-55°C, Package Quantity=1, Self Resonant Frequency=6GHz, Supplier Part Number 1=1065349, Test Frequency=500MHz, Tolerance=3%, Case/Package=0201, Category="Fixed Inductors", ComponentLink1Description=http://www.farnell.com/datasheets/1888743.pdf?src-supplier=Farnell, ComponentLink1URL=http://www.farnell.com/datasheets/1888743.pdf?src-supplier=Farnell, ComponentLink2Description=http://www.mouser.com/ds/2/281/c51e-794816.pdf?src-supplier=Mouser, ComponentLink2URL=http://www.mouser.com/ds/2/281/c51e-794816.pdf?src-supplier=Mouser, ComponentLink3Description=https://media.digikey.com/pdf/Data%20Sheets/Murata%20PDFs/LQP03_Series_Br.pdf?src-supplier=Digi-Key, ComponentLink3URL=https://media.digikey.com/pdf/Data%20Sheets/Murata%20PDFs/LQP03_Series_Br.pdf?src-supplier=Digi-Key, ComponentLink4Description=http://components.arrow.com/part/dataview/49670632S8721729N2606?src-supplier=Arrow+Electronics, ComponentLink4URL=http://components.arrow.com/part/dataview/49670632S8721729N2606?src-supplier=Arrow+Electronics, ComponentLink5Description=https://datasheet.octopart.com/LQP03TN2N7B02D-Murata-datasheet-26765549.pdf?src-supplier=Future+Electronics, ComponentLink5URL=https://datasheet.octopart.com/LQP03TN2N7B02D-Murata-datasheet-26765549.pdf?src-supplier=Future+Electronics, ComponentLink6Description=http://psearch.en.murata.com/inductor/product/LQP03TN2N7B02%23.pdf?src-supplier=Avnet, ComponentLink6URL=http://psearch.en.murata.com/inductor/product/LQP03TN2N7B02%23.pdf?src-supplier=Avnet, ComponentLink7Description=http://search.murata.co.jp/Ceramy/image/img/w_hinm/S0084E.pdf?src-supplier=Digi-Key, ComponentLink7URL=http://search.murata.co.jp/Ceramy/image/img/w_hinm/S0084E.pdf?src-supplier=Digi-Key, ComponentLink8Description=http://www.farnell.com/datasheets/1888743.pdf?src-supplier=Newark, ComponentLink8URL=http://www.farnell.com/datasheets/1888743.pdf?src-supplier=Newark, ComponentLink9Description=http://www.farnell.com/datasheets/1888743.pdf?src-supplier=Element14, ComponentLink9URL=http://www.farnell.com/datasheets/1888743.pdf?src-supplier=Element14, ComponentLink10Description=https://datasheet.octopart.com/LQP03TN2N7B02D-Murata-datasheet-141404629.pdf?src-supplier=TME, ComponentLink10URL=https://datasheet.octopart.com/LQP03TN2N7B02D-Murata-datasheet-141404629.pdf?src-supplier=TME, Core Material=Non-Magnetic, DC Current=500mA, Depth=0.33mm, Height=0.3mm, Height - Seated (Max)=0.013inch, Item Type=Inductor, Lead Free="Lead Free", Length=0.024inch, Manufacturer Part Number=LQP03TN2N7B02D, Max DC Current=500mA, Military Standard=Not, Mount="Surface Mount", Packaging="Tape and Reel", Pricing 1="200=0.007 (GBP)", Q Factor=14, Reach SVHC Compliant=No, RoHS=Yes, RoHS Compliant=Yes, Series=LQP03TN_02, Shielding=Unshielded, Stock 1=4000, Supplier 1=Rs, Technology="THIN FILM", Termination=SMD/SMT, Width=0.012inch
LED1: "20mA 300mcd Colorless Transparent Lens -20℃~+85℃ Positive Stick 455nm~475nm Blue 120° 70mW 3.3V 0603 LED Indication - Discrete ROHS", LCSC Part Number=C965807, Manufacturer=XINGLIGHT, Package=0603, ComponentLink1Description=LCSC, ComponentLink1URL=https://www.lcsc.com/product-detail/LED-Indication-Discrete_XINGLIGHT-XL-1608UBC-04_C965807.html?s_z=n_C965807, Item Type=LED, Manufacturer Part Number=XL-1608UBC-04
Q1: "Trans Mosfet P-ch 30V 4A 3-PIN SOT-23 T/r", Case/Package=TO-236-3, Continuous Drain Current (ID)=4A, Drain to Source Voltage (Vdss)=30V, Input Capacitance=1.2nF, LCSC Part Number=C181091, Manufacturer="Alpha & Omega Semiconductor", Manufacturer Part Number=AO3401A, Max Operating Temperature=150°C, Max Power Dissipation=1.4W, Min Operating Temperature=-55°C, Category=MOSFETs, ComponentLink1Description=https://datasheet.ciiva.com/940/ao3401a-940720.pdf?src-supplier=Digi-Key, ComponentLink1URL=https://datasheet.ciiva.com/940/ao3401a-940720.pdf?src-supplier=Digi-Key, ComponentLink2Description=https://datasheet.ciiva.com/26927/getdatasheetpartid-79048-26927888.pdf?src-supplier=Verical, ComponentLink2URL=https://datasheet.ciiva.com/26927/getdatasheetpartid-79048-26927888.pdf?src-supplier=Verical, Item Type=Mosfet, Lead Free="Lead Free", Mount="Surface Mount", Number of Elements=1, Number of Pins=3, Packaging="Tape and Reel", Power Dissipation=1.4W, Radiation Hardening=No, Rds On Max=44mR, RoHS=Yes, RoHS Compliant=Yes, Series=-, Supplier 1="Arrow Electronics", Supplier Part Number 1=AO3401A
Q2: "MOSFET N-CH 50V 200MA SOT-23", Case/Package=SOT-23-3, Continuous Drain Current (ID)=200mA, Drain to Source Breakdown Voltage=50V, Drain to Source Resistance=3.5R, Gate to Source Voltage (Vgs)=20V, Input Capacitance=50pF, LCSC Part Number=C82045, Manufacturer="ON Semiconductor", Max Operating Temperature=150°C, Max Power Dissipation=225mW, Min Operating Temperature=-55°C, Package Quantity=1, Supplier Part Number 1=BSS138LT1GOSDKR-ND, Threshold Voltage=1.5V, ComponentLink1Description=https://datasheet.ciiva.com/22641/1596366-22641636.pdf, ComponentLink1URL=https://datasheet.ciiva.com/22641/1596366-22641636.pdf, ComponentLink2Description=https://datasheet.ciiva.com/1190/1596366-1190137.pdf, ComponentLink2URL=https://datasheet.ciiva.com/1190/1596366-1190137.pdf, ComponentLink3Description=https://datasheet.ciiva.com/15198/getdatasheetpartid-110266-15198908.pdf, ComponentLink3URL=https://datasheet.ciiva.com/15198/getdatasheetpartid-110266-15198908.pdf, ComponentLink4Description=https://datasheet.ciiva.com/8115/bss138lt1-d-8115295.pdf, ComponentLink4URL=https://datasheet.ciiva.com/8115/bss138lt1-d-8115295.pdf, ComponentLink5Description=https://datasheet.ciiva.com/8115/bss138lt1-d-8115358.pdf, ComponentLink5URL=https://datasheet.ciiva.com/8115/bss138lt1-d-8115358.pdf, ComponentLink6Description=https://datasheet.ciiva.com/1190/1596366-1190136.pdf, ComponentLink6URL=https://datasheet.ciiva.com/1190/1596366-1190136.pdf, ComponentLink7Description=https://datasheet.ciiva.com/936/bss138lt1-d-936802.pdf, ComponentLink7URL=https://datasheet.ciiva.com/936/bss138lt1-d-936802.pdf, ComponentLink8Description=https://datasheet.ciiva.com/936/bss138lt1-d-936801.pdf, ComponentLink8URL=https://datasheet.ciiva.com/936/bss138lt1-d-936801.pdf, ComponentLink9Description=https://datasheet.ciiva.com/14553/70099493-14553829.pdf, ComponentLink9URL=https://datasheet.ciiva.com/14553/70099493-14553829.pdf, ComponentLink10Description=https://datasheet.ciiva.com/936/bss138lt1-d-936803.pdf, ComponentLink10URL=https://datasheet.ciiva.com/936/bss138lt1-d-936803.pdf, ComponentLink11Description=http://www.onsemi.com/pub/Collateral/BSS138LT1-D.PDF?src-supplier=Digi-Key, ComponentLink11URL=http://www.onsemi.com/pub/Collateral/BSS138LT1-D.PDF?src-supplier=Digi-Key, ComponentLink12Description=http://www.farnell.com/datasheets/1596366.pdf?src-supplier=Element14, ComponentLink12URL=http://www.farnell.com/datasheets/1596366.pdf?src-supplier=Element14, ComponentLink13Description=http://www.alliedelec.com/m/d/b3c6fd7d92596813fe75d33dcbaaae90.pdf?src-supplier=Allied+Electronics, ComponentLink13URL=http://www.alliedelec.com/m/d/b3c6fd7d92596813fe75d33dcbaaae90.pdf?src-supplier=Allied+Electronics, ComponentLink14Description=https://www.verical.com/server-webapp/html/getDatasheet?partID=110266&src-supplier=Verical, ComponentLink14URL=https://www.verical.com/server-webapp/html/getDatasheet?partID=110266&src-supplier=Verical, ComponentLink15Description=http://www.onsemi.com/pub_link/Collateral/BSS138LT1-D.PDF?src-supplier=Avnet, ComponentLink15URL=http://www.onsemi.com/pub_link/Collateral/BSS138LT1-D.PDF?src-supplier=Avnet, Contact Plating=Tin,Matte, Current Rating=200mA, Element Configuration=Single, Halogen Free="Halogen Free", Height=1.01mm, Item Type=Mosfet, Lead Free="Lead Free", Length=3.04mm, Manufacturer Part Number=BSS138LT1G, Nominal Vgs=1.5V, Number of Elements=1, Number of Pins=3, On-State Resistance=3.5R, Packaging="Tape and Reel", Power Dissipation=225mW, Pricing 1="1=0.27, 10=0.222, 100=0.1177, 500=0.07746, 1000=0.05267 (USD)", Radiation Hardening=No, Rds On Max=3.5R, REACH SVHC="No SVHC", Stock 1=1283212, Supplier 1=Digi-Key, Turn-Off Delay Time=20ns, Turn-On Delay Time=20ns, Voltage Rating (DC)=50V, Width=1.4mm
R1: library part 0603WAF3300T5E, "100mW Thick Film Resistors 75V ±100ppm/℃ ±1% 330Ω 0603 Chip Resistor - Surface Mount ROHS", LCSC Part Number=C23138, Manufacturer="Royal Electronic Factory", Supplier Part Number=303-0603WAF3300T5E, Item Type=Resistor, Manufacturer Part Number=0603WAF3300T5E, Pricing="10000=0.001 (USD)", RoHS=No, Stock=210000, Supplier=Mouser
R2: library part 0603WAF1004T5E, "100mW Thick Film Resistors ±100ppm/℃ ±1% 1MΩ 0603 Chip Resistor - Surface Mount ROHS", LCSC Part Number=C22935, Manufacturer="UNI-ROYAL(Uniroyal Elec)", Package=0603, Item Type=Resistor, Manfacturer Part Number=0603WAF1004T5E
R3 R4 R7 R9: library part RE0402DRE0710KL, "RES SMD 10K OHM 0.5% 1/16W 0402", Case/Package=0402, LCSC Part Number=C851874, Manufacturer=Yageo, Max Operating Temperature=155°C, Max Power Dissipation=63mW, Min Operating Temperature=-55°C, Supplier Part Number=8132697, Temperature Coefficient=50ppm/°C, Tolerance=0.5%, Category="Chip SMD Resistors", ComponentLink1Description=http://www.yageo.com/NewPortal/yageodocoutput?fileName=/pdf/R-Chip/PYu-RE_105_RoHS_L_6.pdf&src-supplier=Digi-Key, ComponentLink1URL=http://www.yageo.com/NewPortal/yageodocoutput?fileName=/pdf/R-Chip/PYu-RE_105_RoHS_L_6.pdf&src-supplier=Digi-Key, Features="Moisture Resistant", Height=0.015inch, Item Type=Resistor, Length=0.039inch, Manufacturer Part Number=RE0402DRE0710KL, Number of Terminations=2, Packaging="Tape and Reel", Pricing="10000=0.0059, 40000=0.0056, 150000=0.0053, 250000=0.0052, 500000=0.0049 (USD)", RoHS=Yes, RoHS Compliant=Yes, Series=RE, Stock=10000, Supplier="Future Electronics", Width=0.02inch
R5 R8: library part RC0402FR-074K7L, "RES 4.7K OHM 1% 1/16W 0402", Case Code (Imperial)=0402, Case Code (Metric)=1005, LCSC Part Number=C105871, Manufacturer=Yageo, Max Operating Temperature=155°C, Max Power Dissipation=63mW, Min Operating Temperature=-55°C, Power Rating=62.5mW, Resistance=4.7kR, Resistance Tolerance=1%, Resistor Type="Thick Film", Temperature Coefficient=100ppm/°C, Voltage Rating=50V, Case/Package=0402, Category="Chip SMD Resistors", ComponentLink1Description=https://datasheet.ciiva.com/22661/1686128-22661342.pdf?src-supplier=Element14, ComponentLink1URL=https://datasheet.ciiva.com/22661/1686128-22661342.pdf?src-supplier=Element14, ComponentLink2Description=https://datasheet.ciiva.com/7850/1018594-7850022.pdf?src-supplier=Element14, ComponentLink2URL=https://datasheet.ciiva.com/7850/1018594-7850022.pdf?src-supplier=Element14, ComponentLink3Description=https://datasheet.ciiva.com/7850/1018594-7850023.pdf?src-supplier=Element14, ComponentLink3URL=https://datasheet.ciiva.com/7850/1018594-7850023.pdf?src-supplier=Element14, ComponentLink4Description=https://datasheet.ciiva.com/15215/getdatasheetpartid-328119-15215035.pdf?src-supplier=Verical, ComponentLink4URL=https://datasheet.ciiva.com/15215/getdatasheetpartid-328119-15215035.pdf?src-supplier=Verical, Construction=Rectangular, Depth=0.5mm, Features="Moisture Resistant", Height=0.32mm, Height - Seated (Max)=0.016inch, Item Type=Resistor, Lead Free="Lead Free", Length=1mm, Manufacturer Part Number=RC0402FR-074K7L, Military Standard=Not, Number of Pins=2, Number of Terminations=2, Packaging="Tape and Reel", Pricing 1="10000=0.00085 (USD)", Reach SVHC Compliant=Yes, RoHS=Yes, RoHS Compliant=Yes, Series=RC, Size Code=0402, Stock 1=2420000, Supplier 1=Avnet, Supplier Part Number 1=RC0402FR-074K7L, Termination=SMD/SMT, Tolerance=1%, Voltage Rating (DC)=50V, Width=0.5mm
R6: library part RC0603FR-07470RL, "RES 470 OHM 1% 1/10W 0603", Case Code (Imperial)=0603, Case Code (Metric)=1608, LCSC Part Number=C114669, Manufacturer=Yageo, Max Operating Temperature=155°C, Max Power Dissipation=100mW, Min Operating Temperature=-55°C, Package Quantity=1, Resistance Tolerance=1%, Resistor Type="Thick Film", Supplier Part Number 1=311-470HRCT-ND, Temperature Coefficient=100ppm/°C, Voltage Rating=50V, Working Voltage=75V, Case/Package=0603, Category="Chip SMD Resistors", ComponentLink1Description=https://datasheet.ciiva.com/11808/0900766b80f96399-11808177.pdf?src-supplier=RSComponents, ComponentLink1URL=https://datasheet.ciiva.com/11808/0900766b80f96399-11808177.pdf?src-supplier=RSComponents, ComponentLink2Description=https://datasheet.ciiva.com/7746/1738695-7746359.pdf?src-supplier=Element14, ComponentLink2URL=https://datasheet.ciiva.com/7746/1738695-7746359.pdf?src-supplier=Element14, ComponentLink3Description=https://datasheet.ciiva.com/7746/1738695-7746360.pdf?src-supplier=Element14, ComponentLink3URL=https://datasheet.ciiva.com/7746/1738695-7746360.pdf?src-supplier=Element14, ComponentLink4Description=https://datasheet.ciiva.com/7660/1868787-7660793.pdf?src-supplier=Element14, ComponentLink4URL=https://datasheet.ciiva.com/7660/1868787-7660793.pdf?src-supplier=Element14, ComponentLink5Description=https://datasheet.ciiva.com/46440/1868787-46440907.pdf?src-supplier=Element14, ComponentLink5URL=https://datasheet.ciiva.com/46440/1868787-46440907.pdf?src-supplier=Element14, ComponentLink6Description=https://datasheet.ciiva.com/2454/pyu-r-int-thick-7-2454012.pdf?src-supplier=Digi-Key, ComponentLink6URL=https://datasheet.ciiva.com/2454/pyu-r-int-thick-7-2454012.pdf?src-supplier=Digi-Key, ComponentLink7Description=https://datasheet.ciiva.com/2454/pyu-r-int-thick-7-2454013.pdf?src-supplier=Digi-Key, ComponentLink7URL=https://datasheet.ciiva.com/2454/pyu-r-int-thick-7-2454013.pdf?src-supplier=Digi-Key, ComponentLink8Description=https://datasheet.ciiva.com/2454/pyu-r-int-thick-7-2454014.pdf?src-supplier=Digi-Key, ComponentLink8URL=https://datasheet.ciiva.com/2454/pyu-r-int-thick-7-2454014.pdf?src-supplier=Digi-Key, Construction=Rectangular, Depth=0.8mm, Features="Moisture Resistant", Height=0.022inch, Lead Free="Lead Free", Length=1.6mm, Manufacturer Part Number=RC0603FR-07470RL, Military Standard=Not, Number of Terminations=2, Packaging="Tape and Reel", Power Rating=100mW, Pricing 1="1=0.10000, 10=0.02400, 100=0.00970, 1000=0.00436, 2500=0.00378 (USD)", REACH SVHC="No SVHC", Resistance=470R, RoHS=Yes, RoHS Compliant=Yes, Series=RC, Stock 1=154083, Supplier 1=Digi-Key, Technology="THICK FILM", Termination=SMD/SMT, Tolerance=1%, Width=0.031inch
SW1: "None Without bracket 50mA 5.1mm 100000 Times 160gf 12V 5.1mm 1.5mm Round Button Standing paste SPST SMD Tactile Switches ROHS", LCSC Part Number=C318884, Manufacturer=XKB, ComponentLink1Description=LCSC, ComponentLink1URL=https://www.lcsc.com/product-detail/Tactile-Switches_XKB-Connection-TS-1187A-B-A-B_C318884.html?s_z=n_C318884, Item Type=Switch, Manufacturer Part Number=TS-1187A-B-A-B
TP1 TP2 TP3 TP4: "Test Point ON", Item Type="Test Point", Manufacturer Part Number="TEST POINT 0.5mm Dia"
U1: "IC RF TXRX+MCU BLE 48QFN", LCSC Part Number=C77540, Manufacturer="Nordic Semiconductor", ComponentLink1Description=http://www.mouser.com/ds/2/297/nRF52832%20Product%20Brief%20v1.2-890472.pdf?src-supplier=Mouser, ComponentLink1URL=http://www.mouser.com/ds/2/297/nRF52832%20Product%20Brief%20v1.2-890472.pdf?src-supplier=Mouser, ComponentLink2Description=http://infocenter.nordicsemi.com/pdf/nRF52832_PB_v1.7.pdf?src-supplier=Digikey, ComponentLink2URL=http://infocenter.nordicsemi.com/pdf/nRF52832_PB_v1.7.pdf?src-supplier=Digikey, ComponentLink3Description=http://infocenter.nordicsemi.com/pdf/nRF52832_PS_v1.4.pdf?src-supplier=Digikey, ComponentLink3URL=http://infocenter.nordicsemi.com/pdf/nRF52832_PS_v1.4.pdf?src-supplier=Digikey, ComponentLink4Description=https://datasheet.octopart.com/NRF52832-QFAA-R-Nordic-Semiconductor-datasheet-104421228.pdf?src-supplier=LKR, ComponentLink4URL=https://datasheet.octopart.com/NRF52832-QFAA-R-Nordic-Semiconductor-datasheet-104421228.pdf?src-supplier=LKR, Item Type=IC, Manufacturer Part Number=NRF52832-QFAA-R, Pricing="3000=2.746 (USD)", RoHS=Yes, Stock=141000, Supplier="Arrow Electronics"
U2: "ACCEL 2-16G I2C/SPI 12LGA", Case/Package=LGA, LCSC Part Number=C189624, Manufacturer=STMicroelectronics, Max Operating Temperature=85°C, Min Operating Temperature=-40°C, Supplier Part Number=511-LIS2DW12TR, Axis="X, Y, Z", Bandwidth=400Hz, Category=Accelerometers, ComponentLink1Description=http://www.farnell.com/datasheets/2581666.pdf?src-supplier=Farnell, ComponentLink1URL=http://www.farnell.com/datasheets/2581666.pdf?src-supplier=Farnell, Item Type=IC, Manufacturer Part Number=LIS2DW12TR, Mounting Technology="Surface Mount", Output Type=SPI,I2C, Packaging="Cut Tape", Pins=12, Pricing="1=2.65, 10=2.16, 50=2.16, 100=1.54, 1000=1.21, 10000=0.988 (USD)", RoHS=Yes, RoHS Compliant=Yes, Series=-, Stock=14817, Supplier=Mouser
X1: library part Q13FC13500004, "32.768kHz Surface Mount Crystal 12.5pF ±20ppm SMD3215-2P Crystals ROHS", LCSC Part Number=C32346, Manufacturer=Epson, ComponentLink1Description=https://datasheet.octopart.com/Q13FC13500004-Epson-datasheet-62043850.pdf?src-supplier=Farnell, ComponentLink1URL=https://datasheet.octopart.com/Q13FC13500004-Epson-datasheet-62043850.pdf?src-supplier=Farnell, ComponentLink2Description=https://datasheet.octopart.com/Q13FC13500004-Epson-datasheet-32025749.pdf?src-supplier=Newark, ComponentLink2URL=https://datasheet.octopart.com/Q13FC13500004-Epson-datasheet-32025749.pdf?src-supplier=Newark, Item Type=Crystals, Manufacturer Part Number=Q13FC13500004, Reach SVHC Compliant=4187SVHC, RoHS=Yes, Stock=52665, Supplier=Farnell
X2: library part TAXM32M4ZFBCCT2T, "32MHz Surface Mount Crystal 12pF ±10ppm ±10ppm SMD2016-4P Crystals ROHS", LCSC Part Number=C388797, Manufacturer=Yajingxin, Package=SMD2016-4P, ComponentLink1Description=LCSC, ComponentLink1URL=https://www.lcsc.com/product-detail/Crystals_Yajingxin-TAXM32M4ZFBCCT2T_C388797.html?s_z=n_C388797, Item Type=Crystal, Manufacturer Part Number=TAXM32M4ZFBCCT2T

## Free pads (board coordinates)
  round 3 hole 2: MH(-13.183,6.121) MH(0,-14.632) MH(13.183,6.147)

## Via types
v1: diameter 0.6, hole 0.3, Top Layer to Bottom Layer, tented both sides, 68 vias

## Nets (pads, with @x,y where several pads share a name; then routed paths per layer and width w, separated by ;. In a path a pad name is that pad's centre, name@x,y a point inside that pad or via, vN(x,y) a via of type N, cw(c..) or ccw(c..) an arc to the next point about the centre after c; other vN are vias at no path point)
ANT: C13.2 L1.1 U1.30 | length 2.7
  Top Layer w0.229: U1.30 C13.2@0.2,11.456
  Top Layer w0.381: C13.2 L1.1
BATT#: D1.1 Q1.2 R2.2 SW1.1 SW1.2
BATT+: D1.2 J2.1
  other v1: 13.335,-2.591 14.473,-2.591 15.611,-2.591 13.335,2.591 14.473,2.591 15.611,2.591
DEC1: C4.2 U1.1 | length 3.5
  Top Layer w0.203: C4.2 -2.545,2.875 -2.2,3.22 U1.1
DEC4: C5.1 U1.46 | length 1.9
  Top Layer w0.203: C5.1 -4.08,5.647 -3.926,5.493 U1.46
GND: C1.1 C2.1 C3.1 C4.1 C5.2 C6.1 C7.1 C8.1 C9.1 C10.2 C11.2 C13.1 C14.1 C15.2 D2.1 J1.5 J2.2 L3.1 pad.MH Q2.2 R3.1 R9.1 U1.31 U1.45 U1.49 U2.3 U2.5 U2.6 U2.7 U2.8 X2.2 X2.4 | length 12.9
  Top Layer w0.203: v1(-6.259,2.249) -6.259,2.274 -5.746,2.787 C4.1@-5.746,2.905 ; R3.1 -4.583,-5.994 v1(-3.835,-5.994) ; U1.45 -1,5.893 v1(0,6.893) -0.2,7.093 U1.31 ; C8.1 8.585,6.083 v1(8.611,6.109) ; C1.1 v1(8.611,2.448) ; C2.1 v1(8.611,5.013)
  Top Layer w0.254: v1(7.899,-12.268) J1.5
  other v1: -1.511,-10.8 -5.029,-9.194 -1.562,-7.703 9.804,-5.74 -15.492,-3.546 6.606,-3.319 -15.492,-2.663 -15.492,2.663 -6.256,3.487 -15.492,3.546 -1.91,4.983 1.91,4.983 -5.895,6.441 -8.216,7.673 -4.895,7.673 -1.91,8.803 1.91,8.803 -0.423,10.754 1.016,10.754 -10.464,10.783 0.49,12.484 2.31,12.484 -1,13.665 2.31,13.683
NetANT1_1: ANT1.1 L2.2 | length 1.4
  Top Layer w0.381: L2.2 1.4,15.974 ANT1.1
NetC11_1: C11.1 U1.33 | length 8.3
  Top Layer w0.203: C11.1 v1(-5.939,9.818) ; v1@-5.881,11.626 -5.634,11.379 -1.801,11.379 -1,10.579 U1.33
  Bottom Layer w0.203: v1(-5.939,9.818) v1(-5.939,11.684)
NetC12_1: C12.1 L1.2 | length 0.7
  Top Layer w0.381: L1.2@1.4,12.056 C12.1
NetC12_2: C12.2 L2.1 L3.2 | length 1.9
  Top Layer w0.229: L3.2 L3.2@0.308,13.659 ; C12.2@1.394,13.659 C12.2
  Top Layer w0.381: L3.2@0.308,13.659 C12.2@1.394,13.659 ; C12.2@1.4,13.683 L2.1@1.4,14.433
NetD2_2: D2.2 Q2.1 R6.1 R9.2 SW1.3 SW1.4
NetLED1_2: LED1.2 R1.2 | length 1.4
  Top Layer w0.203: R1.2@10.545,8.657 LED1.2
  Top Layer w0.254: R1.2@10.545,8.657 R1.2
NetQ1_1: Q1.1 Q2.3 R2.1 | length 3.4
  Top Layer w0.305: R2.1 5.329,-1.295 Q1.1
NetR3_2: R3.2 U2.11 | length 1.6
  Top Layer w0.203: U2.11 -4.779,-7.788 -4.604,-7.613 R3.2
NetR7_1: R7.1 U2.2 | length 1.8
  Top Layer w0.203: R7.1 -6.959,-9.321 -6.582,-8.944 U2.2
NetTP1_1: TP1.1 U1.47 | length 12.2
  Top Layer w0.203: TP1.1 -11.825,2.475 -9.207,5.093 U1.47
P0.12: C10.1 R6.2 U1.15 | length 13
  Top Layer w0.203: U1.15 3.628,5.493 3.85,5.716 v1(3.85,6.719) 4.227,7.096 C10.1 ; v1(3.85,-0.635) 3.85,-2.453 R6.2@4.36,-2.963
  Bottom Layer w0.203: v1(3.85,-0.635) 3.85,6.693 v1(3.85,6.719)
P0.17: R1.1 U1.20 | length 6.6
  Top Layer w0.203: U1.20 2.969,7.512 3.108,7.512 3.116,7.52 3.683,7.52 4.494,8.331 4.774,8.611 R1.1
P0.21/RESET: J1.3 U1.24 | length 27.2
  Top Layer w0.203: U1.24 4.115,9.093 5.03,10.008 5.466,10.008 v1(5.486,9.987)
  Top Layer w0.254: v1(6.629,-12.675) J1.3
  Bottom Layer w0.254: v1(5.486,9.987) 5.486,9.98 5.964,9.502 5.964,-12.009 v1(6.629,-12.675)
P0.26: R5.2 TP4.1 U1.38 U2.1 | length 38.7
  Top Layer w0.203: TP4.1 -8.164,-4.612 -7.45,-5.326 v1(-7.45,-7.613) R5.2 -6.838,-8.303 -6.697,-8.444 U2.1 ; v1(-10.465,9.093) -10.465,7.036 -10.008,6.579 v1(-7.45,6.579) ; v1(-4.023,9.086) -4.016,9.086 -3.623,8.693 U1.38
  Bottom Layer w0.203: v1(-10.465,9.093) -10.461,9.09 -4.027,9.09 v1(-4.023,9.086) ; v1(-7.45,-7.613) v1(-7.45,6.579)
P0.27: R8.2 TP3.1 U1.39 U2.4 | length 33.3
  Top Layer w0.203: TP3.1 -14.024,-2.261 v1(-9.373,-2.261) ; v1(-7.45,-11.029) R8.2 -6.757,-10.339 -6.363,-9.944 U2.4 ; v1(-4.043,8.293) U1.39
  Bottom Layer w0.203: v1(-7.45,-11.029) -9.373,-9.106 v1(-9.373,-2.261) -9.373,7.647 -8.727,8.293 v1(-4.043,8.293)
P0.28: R4.2 TP2.1 U1.40 U2.12 | length 26.9